# Altium PCB Single_ETU_b_rev1.PcbDoc (part 6 of 6)
Units mil, origin at the board's own origin, x right, y up, seen from the top; angles counter-clockwise.
Board outline 5341 x 2710 mil, 10 copper layers (Top Layer, GND1, Signal 1, GND2, VDDA, VDD, GND3, Signal 2, GND4, Bottom Layer), stack 59.76 mil thick; 283 components, 478 nets, 1863 pads, 875 vias.
Unrouted connection lines stored in the file: 3.
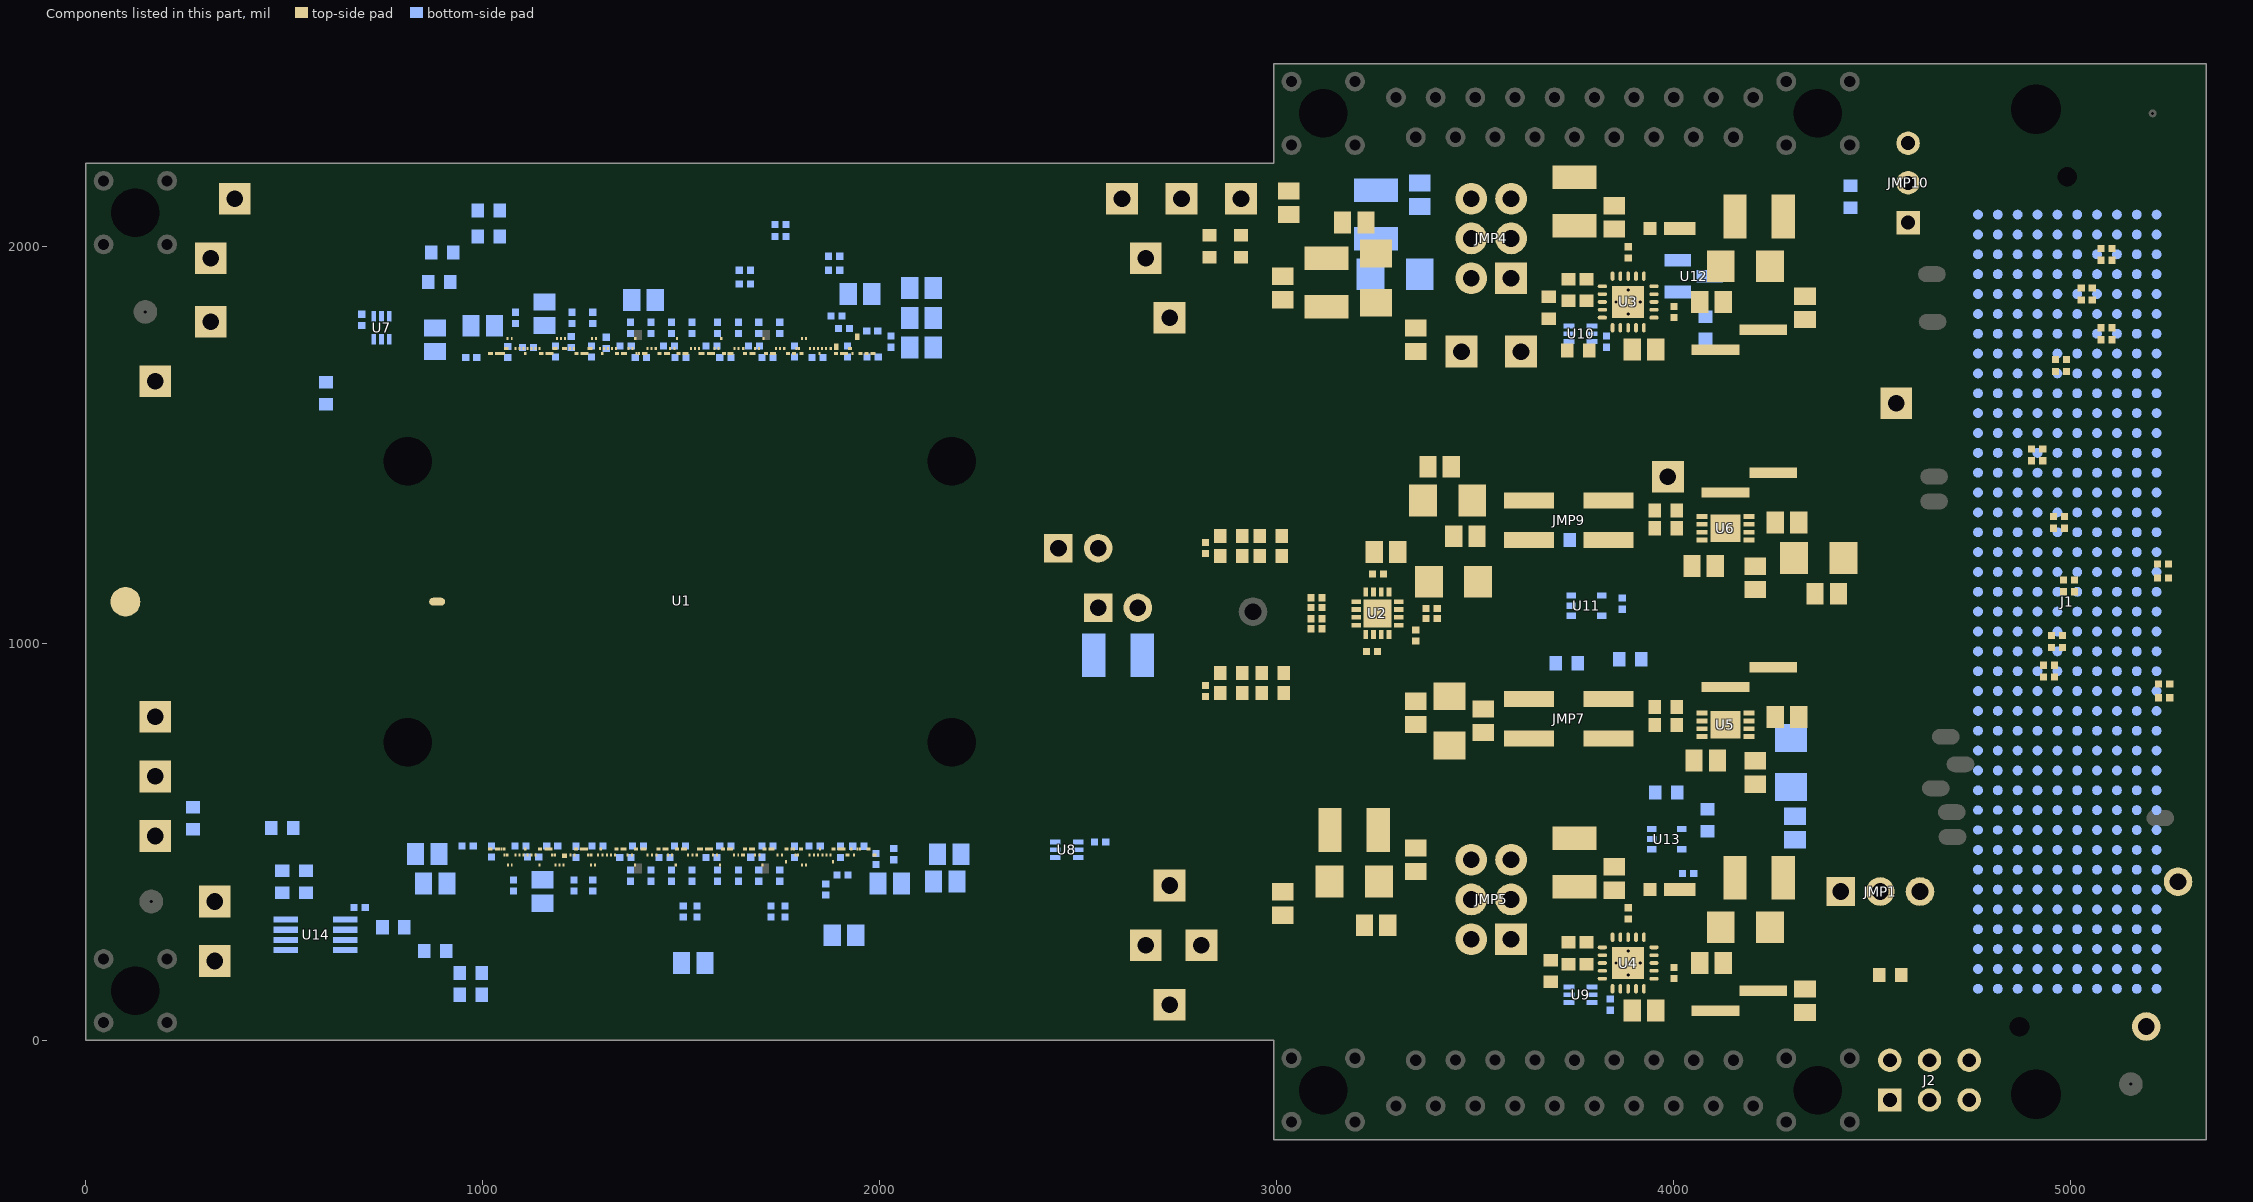
[diagram p14: the components of this part, seen from the top]

## Silkscreen, mask and mechanical layers (free items; w line width, h text height) (continued)
Mechanical 1:
  drawing of 613 lines, arcs and shapes, not listed
  text "62mm MCP" at 1260,2225 h55
  text "0.0" at 923,1691.24 h8
  text "0.0" at 2048,1691 h8
  text "high volt wire path" at -235,945 h50
  text "Timepix4 / Top" at 1486,626 h60
  text "0.0" at 923,512 h8
  text "keep out regions" at 2115,-180 h50
  text "Bottom side / J1  FMC HPC / Mezzanine (Male) / Samtec / ASP-134488-01 / 10mm mating height" at 5510,-865 h60
  text "UCB: Space Sciences Lab" at 2593,-1409 h60
  text "Single Timepix (ETU)" at 2636,-1790 h70
  text "M Dexter" at 1645,-1818 h45
  text "Apr 2021" at 2073,-1855 h45
  text "1" at 3900,-2183 h45
  text "EAG00233" at 3251,-2190 h45
  text "EAG" at 2700,-2193 h45
Mechanical 2:
  text "MECH 2 : BOND WIRES" at -20,-1745 h50
Mechanical 3:
  lines w10: 1982.22,1708 1982.22,2800 ; 4910,2425 4910,2475 4949,2514 5399,2514 5503.5,2618.5 ; 5016,2460 5046,2490 5046,2730 5016,2760 5016,2800 ; 0,0 2992,0 2992,-250 5341,-250 5341,2460 2992,2460 2992,2210 0,2210 0,0
  text ".050\" / dia" at 4816,2725 h60
  text "1 of 2 / 0.125\" dia / mounting hole / reserved micro / jack screw standoff" at 5484,2646 h60
  text "MECH 3 : DIMENSION LINES" at -470,-1870 h50
Mechanical 4:
  lines w3: 0,2210 2742,2210 2992,2210 2992,2460 5341,2460 5341,-250 2992,-250 2992,0 0,0 0,2210 ; 0,2210 0,2210
  text "MECH 4 : BOARD OUTLINE" at 55,-1995 h50
Mechanical 5:
  text "MECH 5 : BOARD CORNER FIDUCIALS" at 10,-2185 h50
Mechanical 6:
  text "MECH 6 : PLACEMENT PRACTICE" at -110,-2320 h50
Fab Notes:
  rectangle: 1757,425 1774,440
  rectangle: 1433,1739 1445,1755
  rectangle: 1491,1733 1498,1747
  region: 1873.5,471 1873.5,462 1895,462 1895,471
  region: 1906,482 1893.5,482 1893.5,462 1906,462
  rectangle: 1705,461 1714,477
  rectangle: 1705,454 1725,471
  region: 1495,464 1495,474 1485,474 1485,464
  rectangle: 1484.5,473 1494.5,479
  rectangle: 1483,420 1504,446
  rectangle: 1879,434 1892,454
  rectangle: 1761,434 1774,459
  rectangle: 1434,455 1443,471
  rectangle: 1536,455 1546,471
  rectangle: 1651,445 1665,471
  rectangle: 1031,476 1110.03,505
  rectangle: 1381,1764 1395,1785
  rectangle: 1756.5,1739 1769,1755
  rectangle: 1653,1739 1665,1755
  rectangle: 1617,1705 1632,1734
  rectangle: 1348.5,1705 1364,1734
  rectangle: 1704.5,476 1714.5,492
  region: 1977,505 1967,505 1967,478 1977,478
  region: 1956.5,493 1941.5,493 1941.5,476 1956.5,476
  rectangle: 1945,469 1960,493
  rectangle: 1911.5,451 1926,471
  rectangle: 1893.5,476 1931,505
  rectangle: 1867,476 1888.5,493
  rectangle: 1783,453 1805,471
  rectangle: 1670.5,476 1685.5,505
  region: 1363,476 1363,505 1346.5,505 1346.5,476
  rectangle: 1615.5,476 1630.5,505
  rectangle: 1559.5,476 1579.5,505
  rectangle: 1452.5,476 1467.5,505
  rectangle: 1499.5,477 1514.5,505
  rectangle: 1376.51,476 1391.51,492
  rectangle: 1701,420 1721,446
  rectangle: 1595,420 1620,446
  rectangle: 1381,420 1401,446
  rectangle: 1314.5,476 1341.5,492
  rectangle: 1245.5,476 1303,505
  rectangle: 1204,476 1240.03,492
  rectangle: 1124,476 1149.53,492
  rectangle: 1155.25,476 1189,505
  rectangle: 1945,1718 1956.01,1734
  rectangle: 1961.49,1705 1971.49,1734
  rectangle: 1919,1739 1941.5,1758
  rectangle: 1900.01,1705 1934,1734
  rectangle: 1873.5,1718 1894.5,1734
  rectangle: 1784,1739 1807,1758
  rectangle: 1746.5,1718 1773.5,1734
  rectangle: 1708,1718 1718,1747
  rectangle: 1704.03,1764 1717.03,1781
  rectangle: 1598,1764 1611,1781
  rectangle: 1671.5,1705 1686.5,1734
  rectangle: 1564.5,1705 1584.5,1734
  rectangle: 1601.75,1718 1612,1751
  rectangle: 1542.5,1739 1554.5,1755
  rectangle: 1484.5,1763.5 1499,1784
  rectangle: 1456,1705 1471,1734
  rectangle: 1486.1,1719 1497.5,1734
  rectangle: 1503,1705 1518,1734
  rectangle: 1400.5,1705 1415.5,1734
  rectangle: 1246.5,1705 1305,1734
  rectangle: 1212,1718 1241,1734
  rectangle: 1124,1718 1153,1734
  rectangle: 1158.5,1705 1198,1734
  rectangle: 1031,1705 1111,1734
  rectangle: 1041.23,1739 1065,1755.02
  rectangle: 1001.61,1718 1025.39,1735
  rectangle: 1162.23,1739 1188,1755
  rectangle: 1599,471 1610,492
  rectangle: 1748,476 1770.5,492
  rectangle: 1529,1718 1558,1734
  rectangle: 1423.5,1719 1450.5,1734
  rectangle: 1317.5,1718 1343.5,1734
  rectangle: 1252,1739 1276,1755
  rectangle: 1385,1718 1395.5,1743
  rectangle: 1778.5,1705 1851,1734
  rectangle: 1775.5,476 1852,505
  rectangle: 1421,476 1447.5,492
  rectangle: 1483.5,478 1494.5,492
  rectangle: 1525.5,476 1554.5,492
  rectangle: 1641.5,476 1665.5,492
  rectangle: 1009.78,502 1982.22,1708
  rectangle: 1723.5,1705 1738.5,1734
  rectangle: 1641,1718 1666,1734
  rectangle: 1719.5,476 1734.5,505
  rectangle: 1397.5,478 1412.5,505
  lines w8: 1490,1731.34 1493.95,1735.29 1493.95,1737.68 1505,1748.73
  text "SOFT GOLD" at 1150,-275 h50
Drill Drawing:
  drawing of 875 lines, arcs and shapes, not listed
  text "1" at -9521,11925 h70
  text "2" at -5526,11925 h70
  text "3" at -1531,11925 h70
  text "4" at 2470.01,11925 h70
  text "5" at 6468.34,11925 h70
  text "6" at 10466.68,11925 h70
  text "7" at 14468.34,11925 h70
  text "8" at 18463.34,11925 h70
  text "REVISION STATUS" at 16775.6,11640.54 h109.4
  text "DRAWN" at 18296,11463 h60
  text "APPROVED" at 19097,11462.44 h60
  text "DATE" at 19805.6,11462.44 h60
  text "REV" at 15610.8,11453.44 h60
  text "DESCRIPTION" at 16516,11443 h75
  text "Jason" at 19016,11198 h70
  text "Apr 2021" at 19696,11134 h60
  text "INITIAL RELEASE" at 16471,11133 h60
  text "0" at 15620,11121 h60
  text "McPhate" at 19016,11068 h70
  text "M Dexter" at 18205,11013 h70
  text "NOTES (UNLESS OTHERWISE SPECIFIED):" at -8563,10559 h125
  text "1. MATERIAL .063 INCH THICK POLYIMIDE, 10 LAYERS." at -8368,10175 h125
  text "1/2 OZ. COPPER CLAD, OUTER LAYERS AND INNER LAYERS 3 AND 8." at -8043,9950 h125
  text "Layer" at 10167.5,9800.47 h60
  text "Name" at 10577.41,9800.47 h60
  text "Material" at 11507.16,9800.47 h60
  text "Thickness" at 12366.92,9800.47 h60
  text "Constant" at 13016.76,9800.47 h60
  text "Board Layer Stack" at 13586.62,9800.47 h60
  text "1 OZ. COPPER CLAD, INNER PLANE AND SPLIT PLANE LAYERS." at -8053,9705 h125
  text "Top Overlay" at 10577.41,9680.47 h60
  text "Top Solder" at 10577.41,9560.47 h60
  text "Solder Resist" at 11507.16,9560.47 h60
  text "0.50mil" at 12366.92,9560.47 h60
  text "4.2" at 13016.76,9560.47 h60
  text "A" at -11378,9527 h70
  text "A" at 20322,9527 h70
  text "OUTER LAYERS 1 AND 10 CONTROLLED  IMPEDANCE TO BE 93 OHM" at -8038,9470 h125
  text "1" at 10167.5,9440.47 h60
  text "Top Layer" at 10577.41,9440.47 h60
  text "0.69mil" at 12366.92,9440.47 h60
  text "Dielectric 1" at 10577.41,9320.47 h60
  text "FR-4" at 11507.16,9320.47 h60
  text "4.42mil" at 12366.92,9320.47 h60
  text "3.41" at 13016.76,9320.47 h60
  text "DIFFERENTIAL FOR .00504 WIDE MIICROSTRIP TRACES REFERENCE PLANES LAYERS 2 AND 9" at -8038,9238 h125
  text "2" at 10167.5,9200.47 h60
  text "GND1" at 10577.41,9200.47 h60
  text "CF-004" at 11507.16,9200.47 h60
  text "1.38mil" at 12366.92,9200.47 h60
  text "Dielectric 2" at 10577.41,9080.47 h60
  text "7.00mil" at 12366.92,9080.47 h60
  text "3.89" at 13016.76,9080.47 h60
  text "INNER LAYERS 3 AND 8 CONTROLLED  IMPEDANCE TO BE 93 OHM" at -8043,8975 h125
  text "3" at 10167.5,8960.47 h60
  text "Signal 1" at 10577.41,8960.47 h60
  text "CF-004" at 11507.16,8960.47 h60
  text "0.69mil" at 12366.92,8960.47 h60
  text "Dielectric 3" at 10577.41,8840.47 h60
  text "PP-006" at 11507.16,8840.47 h60
  text "5.15mil" at 12366.92,8840.47 h60
  text "3.505" at 13016.76,8840.47 h60
  text "DIFFERENTIAL FOR .00516 WIDE STRIPLINE TRACES (SYMMTERIC REFERENCE PLANES LAYERS 2/4 AND 7/9" at -8043,8743 h125
  text "4" at 10167.5,8720.47 h60
  text "GND2" at 10577.41,8720.47 h60
  text "CF-004" at 11507.16,8720.47 h60
  text "1.38mil" at 12366.92,8720.47 h60
  text "Dielectric 4" at 10577.41,8600.47 h60
  text "PP-006" at 11507.16,8600.47 h60
  text "4.20mil" at 12366.92,8600.47 h60
  text "3.52" at 13016.76,8600.47 h60
  text "5" at 10167.5,8480.47 h60
  text "VDDA" at 10577.41,8480.47 h60
  text "CF-004" at 11507.16,8480.47 h60
  text "1.38mil" at 12366.92,8480.47 h60
  text "0.063\"" at 15500.2,8387.5 h75
  text "2. PLATE INDICATED AREAS, SEE GOLD MASK, WITH 7-15 MICROINCHES OF SOFT BONDABLE GOLD," at -8398,8375.02 h125
  text "Dielectric 5" at 10577.41,8360.47 h60
  text "PP-006" at 11507.16,8360.47 h60
  text "7.20mil" at 12366.92,8360.47 h60
  text "3.6" at 13016.76,8360.47 h60
  text "+/- 10%" at 15483.2,8251.5 h62.5
  text "6" at 10167.5,8240.47 h60
  text "VDD" at 10577.41,8240.47 h60
  text "CF-004" at 11507.16,8240.47 h60
  text "1.38mil" at 12366.92,8240.47 h60
  text "OVER 100-150 MICROINCHES OF NICKEL, TOP SIDE ONLY." at -8068,8131.38 h125
  text "Dielectric 7" at 10577.41,8120.47 h60
  text "PP-006" at 11507.16,8120.47 h60
  text "4.20mil" at 12366.92,8120.47 h60
  text "3.52" at 13016.76,8120.47 h60
  text "7" at 10167.5,8000.47 h60
  text "GND3" at 10577.41,8000.47 h60
  text "CF-004" at 11507.16,8000.47 h60
  text "1.38mil" at 12366.92,8000.47 h60
  text "3. ELECTROLESS NICKEL IMMERSION GOLD (ENIG) IPC-4522 BOTH SIDES." at -8402,7995 h125
  text "Dielectric 6" at 10577.41,7880.47 h60
  text "PP-006" at 11507.16,7880.47 h60
  text "5.15mil" at 12366.92,7880.47 h60
  text "3.505" at 13016.76,7880.47 h60
  text "4. ALL PLATED THROUGH HOLES TO HAVE PLATING IN HOLES .001 MINIMUM THICKNESS." at -8395,7778 h125
  text "8" at 10167.5,7760.47 h60
  text "Signal 2" at 10577.41,7760.47 h60
  text "CF-004" at 11507.16,7760.47 h60
  text "0.69mil" at 12366.92,7760.47 h60
  text "Dielectric 8" at 10577.41,7640.47 h60
  text "PP-006" at 11507.16,7640.47 h60
  text "7.00mil" at 12366.92,7640.47 h60
  text "3.89" at 13016.76,7640.47 h60
  text "5. HOLES SIZES ARE AFTER PLATING." at -8391,7540 h125
  text "9" at 10167.5,7520.47 h60
  text "GND4" at 10577.41,7520.47 h60
  text "CF-004" at 11507.16,7520.47 h60
  text "1.38mil" at 12366.92,7520.47 h60
  text "Dielectric 9" at 10577.41,7400.47 h60
  text "PP-006" at 11507.16,7400.47 h60
  text "4.42mil" at 12366.92,7400.47 h60
  text "3.41" at 13016.76,7400.47 h60
  text "6. FULLY PLUG ALL 16MIL VIAS WITH CONDUCTIVE MATERIAL" at -8391,7316 h125
  text "10" at 10167.5,7280.47 h60
  text "Bottom Layer" at 10577.41,7280.47 h60
  text "0.69mil" at 12366.92,7280.47 h60
  text "Bottom Solder" at 10577.41,7160.47 h60
  text "Solder Resist" at 11507.16,7160.47 h60
  text "0.50mil" at 12366.92,7160.47 h60
  text "4.2" at 13016.76,7160.47 h60
  text "7. THE FOUR 0.122\" HOLES AT (X=811,Y=751), (X=811,Y=1459), (X=2181,Y=751), and (X=2181,Y=1459) ARE COUNTERSINK 100 DEG X 0.200\" WIDE." at -8410,7097 h125
  text "Bottom Overlay" at 10577.41,7040.47 h60
  text "8. SOLDER MASK COMP AND SOLDER SIDE OVER" at -8406,6878 h125
  text "BARE COPPER WITH LIQUID PHOTO-IMAGEABLE" at -8064,6654 h125
  text "SOLDER MASK, COLOR: GREEN." at -8067,6442 h125
  text "9. SILKSCREEN COMP AND SOLDER SIDES USING" at -8414,6222 h125
  text "NON-CONDUCTIVE EPOXY INK, COLOR: WHITE." at -8061,5989 h125
  text "10.DIELECTRIC THICKNESS CONTROL FOR OUTER AND INNER LAYERS" at -8414,5756 h125
  text "TO ACHIEVE 93 OHM DIFFERENTIAL IMPEDANCE" at -8108,5544 h125
  text "11.BOARD FABRICATION SHALL BE PER IPC 6012B CLASS 2." at -8403,5309 h125
  text "B" at -11378,4527 h70
  text "B" at 20322,4527 h70
  text "BOARD HAS 93 OHM IMPEDANCE DIFFERENTIAL SYMMETRIC STRIPLINE TRACES LAYERS 3 AND 8" at 10092,3998 h100
  text "REFERENCE PLANES LAYERS 2 / 4, AND 7 / 9 RESPECTIVELY" at 10086,3698 h100
  text "BOARD HAS 93 OHM IMPEDANCE DIFFERENTIAL MICROSTRIP TRACES LAYERS 1 AND 10" at 10105.31,3281.17 h100
  text "REFERENCE PLANES LAYERS 2 AND 9 RESPECTIVELY" at 10096,3003 h100
  text "C" at -11378,-473 h70
  text "C" at 20322,-473 h70
  text "Symbol" at -9605.06,-4575.01 h72
  text "Count" at -9099.18,-4575.01 h72
  text "Hole Size" at -8459.35,-4575.01 h72
  text "Plated" at -7309.69,-4575.01 h72
  text "Hole Type" at -6803.82,-4575.01 h72
  text "Drill Layer Pair" at -6070.01,-4575.01 h72
  text "Via/Pad" at -4570.46,-4575.01 h72
  text "Pad Shape" at -3980.61,-4575.01 h72
  text "Template" at -3234.82,-4575.01 h72
  text "Description" at -2095.15,-4575.01 h72
  text "Hole Tolerance (+)" at -1241.39,-4575.01 h72
  text "Hole Tolerance (-)" at 92.22,-4575.01 h72
  text "2" at -9099.18,-4725.01 h60
  text "50.00mil (1.270mm)" at -8459.35,-4725.01 h60
  text "NPTH" at -7309.69,-4725.01 h60
  text "Round" at -6803.82,-4725.01 h60
  text "Top Layer - Bottom Layer" at -6070.01,-4725.01 h60
  text "Pad" at -4570.46,-4725.01 h60
  text "Rounded" at -3980.61,-4725.01 h60
  text "c5hn127" at -3234.82,-4725.01 h60
  text "2" at -9099.18,-4875.01 h60
  text "125.00mil (3.175mm)" at -8459.35,-4875.01 h60
  text "NPTH" at -7309.69,-4875.01 h60
  text "Round" at -6803.82,-4875.01 h60
  text "Top Layer - Bottom Layer" at -6070.01,-4875.01 h60
  text "Pad" at -4570.46,-4875.01 h60
  text "Rounded" at -3980.61,-4875.01 h60
  text "c5hn318" at -3234.82,-4875.01 h60
  text "3" at -9099.18,-5025.01 h60
  text "35.43mil (0.900mm)" at -8459.35,-5025.01 h60
  text "PTH" at -7309.69,-5025.01 h60
  text "Round" at -6803.82,-5025.01 h60
  text "Top Layer - Bottom Layer" at -6070.01,-5025.01 h60
  text "Pad" at -4570.46,-5025.01 h60
  text "(Mixed)" at -3980.61,-5025.01 h60
  text "(Mixed)" at -3234.82,-5025.01 h60
  text "6" at -9099.18,-5175.01 h60
  text "35.00mil (0.889mm)" at -8459.35,-5175.01 h60
  text "PTH" at -7309.69,-5175.01 h60
  text "Round" at -6803.82,-5175.01 h60
  text "Top Layer - Bottom Layer" at -6070.01,-5175.01 h60
  text "Pad" at -4570.46,-5175.01 h60
  text "Rounded" at -3980.61,-5175.01 h60
  text "(Mixed)" at -3234.82,-5175.01 h60
  text "10" at -9099.18,-5325.01 h60
  text "122.00mil (3.099mm)" at -8459.35,-5325.01 h60
  text "NPTH" at -7309.69,-5325.01 h60
  text "Round" at -6803.82,-5325.01 h60
  text "Top Layer - Bottom Layer" at -6070.01,-5325.01 h60
  text "Pad" at -4570.46,-5325.01 h60
  text "Rounded" at -3980.61,-5325.01 h60
  text "(Mixed)" at -3234.82,-5325.01 h60
  text "D" at -11378,-5473 h70
  text "D" at 20322,-5473 h70
  text "46" at -9099.18,-5475.01 h60
  text "42.00mil (1.067mm)" at -8459.35,-5475.01 h60
  text "PTH" at -7309.69,-5475.01 h60
  text "Round" at -6803.82,-5475.01 h60
  text "Top Layer - Bottom Layer" at -6070.01,-5475.01 h60
  text "(Mixed)" at -4570.46,-5475.01 h60
  text "(Mixed)" at -3980.61,-5475.01 h60
  text "(Mixed)" at -3234.82,-5475.01 h60
  text "62" at -9099.18,-5625.01 h60
  text "28.00mil (0.711mm)" at -8459.35,-5625.01 h60
  text "PTH" at -7309.69,-5625.01 h60
  text "Round" at -6803.82,-5625.01 h60
  text "Top Layer - Bottom Layer" at -6070.01,-5625.01 h60
  text "Pad" at -4570.46,-5625.01 h60
  text "Rounded" at -3980.61,-5625.01 h60
  text "c127h71_2855881866" at -3234.82,-5625.01 h60
  text "160" at -9099.18,-5775.01 h60
  text "16.00mil (0.406mm)" at -8459.35,-5775.01 h60
  text "PTH" at -7309.69,-5775.01 h60
  text "Round" at -6803.82,-5775.01 h60
  text "Top Layer - Bottom Layer" at -6070.01,-5775.01 h60
  text "Via" at -4570.46,-5775.01 h60
  text "Rounded" at -3980.61,-5775.01 h60
  text "v76h41" at -3234.82,-5775.01 h60
  text "725" at -9099.18,-5925.01 h60
  text "8.00mil (0.203mm)" at -8459.35,-5925.01 h60
  text "PTH" at -7309.69,-5925.01 h60
  text "Round" at -6803.82,-5925.01 h60
  text "Top Layer - Bottom Layer" at -6070.01,-5925.01 h60
  text "(Mixed)" at -4570.46,-5925.01 h60
  text "Rounded" at -3980.61,-5925.01 h60
  text "(Mixed)" at -3234.82,-5925.01 h60
  text "1016 Total" at -9099.18,-6075.01 h60
  text "UNLESS OTHERWISE SPECIFIED:" at 14363.07,-6478.93 h31
  text "ENGINEER:" at 15747,-6485 h45
  text "TITLE:" at 17247,-6485 h45
  text "ALL DIMENSIONS ARE IN INCHES" at 14363.07,-6561.63 h27.9
  text "Jason McPhate, Matt Dexter" at 15740,-6600 h70
  text "REMOVE ALL BURRS" at 14363.07,-6644.23 h27.9
  text "UCB: Space Sciences Lab" at 17460,-6690 h135
  text "BREAK ALL SHARP EDGES" at 14363.07,-6726.93 h27.9
  text "PCB DESIGNER:" at 15747,-6780 h45
  text "TOLERANCES ARE FOR FINISHED PART" at 14363.07,-6809.63 h27.9
  text "TOLERANCES FOR FINISHED PART:" at 14363.07,-6892.33 h27.9
  text "X= +/- 0.1" at 14363.07,-6974.93 h27.9
  text "ANGULAR= +/- 0.003" at 14900.37,-6974.93 h27.9
  text "XX= +/- 0.01" at 14363.07,-7057.63 h27.9
  text "HOLE DIA=" at 14900.37,-7057.63 h27.9
  text "DATE:" at 15747,-7085 h45
  text "PART NO.:" at 17247,-7085 h45
  text "REV:" at 19347,-7085 h45
  text "XXX= +/- 0.001" at 14363.07,-7140.33 h27.9
  text "1" at 19659,-7192 h80
  text "Single Timepix4  (ETU)" at 17562,-7200 h90
  text "Apr 19, 2021" at 15797,-7205 h70
  text "MATERIAL" at 14350.93,-7240 h31
  text "FILE NAME:" at 15747,-7385 h45
  text "DWG NO:" at 17247,-7385 h45
  text "SCALE:" at 19347,-7385 h45
  text "FINISH" at 14350.93,-7445 h31
  text "EAG 00233" at 17562,-7498 h90
  text "NONE" at 19636,-7507 h70
  text "1" at -9521,-7770 h70
  text "2" at -5526,-7770 h70
  text "3" at -1531,-7770 h70
  text "4" at 2470.01,-7770 h70
  text "5" at 6468.34,-7770 h70
  text "6" at 10466.68,-7770 h70
  text "7" at 14468.34,-7770 h70
  text "8" at 18463.34,-7770 h70
Assembly Top:
  lines w10: 49.7,-1933.7 1450.7,-1933.7 ; 49.7,-1733.7 1450.7,-1733.7 ; 49.7,-1533.7 1450.7,-1533.7 ; 49.7,-1333.7 1450.7,-1333.7 ; 49.7,-1133.7 1450.7,-1133.7 ; 925.7,-1933.7 925.7,-933.7 ; 1450.7,-2113.7 1450.7,-933.7 ; 1450.7,-1932.7 3649.7,-1932.7 ; 1450.7,-1732.7 3649.7,-1732.7 ; 1450.7,-1532.7 3649.7,-1532.7 ; 1450.7,-1232.7 3649.7,-1232.7 ; 2124.7,-2113.7 2124.7,-1932.7 ; 3174.7,-1732.7 3174.7,-1538.7 ; 49.7,-2113.7 3649.7,-2113.7 3649.7,-933.7 1449.7,-933.7 49.7,-933.7 49.7,-2113.7
  text "1. WORKMANSHIP IS IPC 610, CLASS 2." at 724.7,-357.7 h50
  text "2. POPULATE ASSEMBLY PER BILL OF MATERIALS" at 724.7,-457.7 h50
  text "3. STATIC SENSITIVE DEVICES. OBSERVE PROPER" at 724.7,-557.7 h50
  text "ESD HANDLING PROCEDURES." at 874.7,-657.7 h50
  text "APPROVALS" at 299.7,-1063.7 h60
  text "DATE" at 1099.7,-1063.7 h60
  text "TOP ASSEMBLY DRAWING" at 1727.7,-1117.7 h80
  text "DRAWN" at 99.7,-1213.7 h50
  text "Apr 2021" at 964.7,-1279.64 h60
  text "UCB: Space Sciences Lab" at 1723,-1356 h90
  text "Dexter" at 83,-1384 h60
  text "CHECKED" at 99.7,-1413.7 h50
  text "Apr 2021" at 961.7,-1480.64 h60
  text "TBD" at 294,-1499 h60
  text "ENGR" at 99.7,-1613.7 h50
  text "TIMEPIX4 SCB" at 2066,-1666 h80
  text "Apr 2021" at 971.83,-1671.41 h60
  text "TITLE:" at 1491.6,-1672.5 h80
  text "REV 1" at 3212.6,-1672.5 h80
  text "Dexter" at 264,-1697 h60
  text "QUALITY" at 99.7,-1813.7 h50
  text "EAG 00233" at 2036.92,-1869.13 h80
  text "ASSURANCE" at 99.7,-1913.7 h50
  text "PRINT DATE:" at 2199.7,-2063.7 h50
  text "Apr 2021" at 2724.7,-2063.7 h60
Assembly Bot:
  lines w10: 64.3,-1949.5 2263.3,-1949.5 ; 64.3,-1749.5 2263.3,-1749.5 ; 64.3,-1549.5 2263.3,-1549.5 ; 64.3,-1249.5 2263.3,-1249.5 ; 539.3,-1749.5 539.3,-1555.5 ; 1589.3,-2130.5 1589.3,-1949.5 ; 2263.3,-2130.5 2263.3,-950.5 ; 2263.3,-1950.5 3664.3,-1950.5 ; 2263.3,-1750.5 3664.3,-1750.5 ; 2263.3,-1550.5 3664.3,-1550.5 ; 2263.3,-1350.5 3664.3,-1350.5 ; 2263.3,-1150.5 3664.3,-1150.5 ; 2788.3,-1950.5 2788.3,-950.5 ; 64.3,-2130.5 3664.3,-2130.5 3664.3,-950.5 2264.3,-950.5 64.3,-950.5 64.3,-2130.5
  text "1. WORKMANSHIP IS IPC 610, CLASS 2." at 2989.3,-374.5 h50
  text "2. POPULATE ASSEMBLY PER BILL OF MATERIALS" at 2989.3,-474.5 h50
  text "3. STATIC SENSITIVE DEVICES. OBSERVE PROPER" at 2989.3,-574.5 h50
  text "ESD HANDLING PROCEDURES." at 2839.3,-674.5 h50
  text "DATE" at 2614.3,-1080.5 h60
  text "APPROVALS" at 3414.3,-1080.5 h60
  text "BOT ASSEMBLY DRAWING" at 1986.3,-1134.5 h80
  text "DRAWN" at 3614.3,-1230.5 h50
  text "Apr 2021" at 2749.3,-1296.44 h60
  text "Dexter" at 3774,-1355 h60
  text "UCB: Space Sciences Lab" at 1907,-1366 h90
  text "CHECKED" at 3614.3,-1430.5 h50
  text "Apr 2021" at 2752.3,-1497.44 h60
  text "TBD" at 3429,-1522 h60
  text "ENGR" at 3614.3,-1630.5 h50
  text "TIMEPIX4 SCB" at 1762,-1685 h80
  text "REV 1" at 501.4,-1689.3 h80
  text "TITLE:" at 2222.4,-1689.3 h80
  text "Apr 2021" at 2752.3,-1692.44 h60
  text "Dexter" at 3440,-1712 h60
  text "QUALITY" at 3614.3,-1830.5 h50
  text "EAG 00233" at 1782.53,-1892.15 h80
  text "ASSURANCE" at 3614.3,-1930.5 h50
  text "Apr 2021" at 989.3,-2080.5 h60
  text "PRINT DATE:" at 1514.3,-2080.5 h50

## Dimensions
1982.22,2800 to 4701.97,2985 on Mechanical 3
5341,2460 to 5206,2335 on Mechanical 5
5206,2335 to 5341,2460 on Mechanical 5
150,1835 to -5,2210 on Mechanical 5
5151,-110 to 5341,-250 on Mechanical 5
5151,-110 to 5341,-250 on Mechanical 5
0,0 to 165,350 on Mechanical 5
0,0 to 165,350 on Mechanical 5
5341,-250 to 4744,-150 on Mechanical 3
0,0 to 4544,-150 on Mechanical 3
4990.99,1105 to 4912.26,-135.15 on Mechanical 3
4990.99,1105 to 4912.26,2345.15 on Mechanical 3
4990.99,1105 to 4912.26,-135.15 on Mechanical 3
0,0 to 5341,-250 on Mechanical 3
0,0 to 265,1135 on Mechanical 3
0,0 to 1982.22,502 on Mechanical 3
0.5,1150 to 0.5,1350 on Mechanical 3
0,2210 to 125,2085 on Mechanical 3
1982.22,1708 to 1982.22,502 on Mechanical 3
0,0 to 945,1694.76 on Mechanical 3
4363,-125 to 4363,2335 on Mechanical 3
2992,0 to 3117,-125 on Mechanical 3
2992,-250 to 2992,0 on Mechanical 3
5341,2460 to 5341,-250 on Mechanical 3
2992,2210 to 3117,2335 on Mechanical 3
2992,2210 to 2992,2460 on Mechanical 3
0,0 to 2763,182 on Mechanical 3
3117,2335 to 4363,2335 on Mechanical 3
5341,-250 to 5347,1105 on Mechanical 3
1496,1105 to 0,0 on Mechanical 3
1496,1105 to 0,0 on Mechanical 3
1009.78,502 to 0,0 on Mechanical 3
1009.78,502 to 0,0 on Mechanical 3
0,0 to 811,751 on Mechanical 3
0,0 to 125,125 on Mechanical 3
0,0 to 811,751 on Mechanical 3
4701.97,2479.83 to 5279.97,2486.28 on Mechanical 3
4871,34.5 to 4991,2175.5 on Mechanical 3
4871,34.5 to 4990.99,1105 on Mechanical 3
4871,34.5 to 4991,7 on Mechanical 3
4991,2175.5 to 0,0 on Mechanical 3
811,1459 to 0,0 on Mechanical 3
811,1459 to 2181,1459 on Mechanical 3
2181,751 to 2181,1459 on Mechanical 3
1009.56,2310 to 1982,2310 on Mechanical 3
0,0 to 2992,0 on Mechanical 3
0,0 to 0,2210 on Mechanical 3
0,0 to 125,2085 on Mechanical 3
0,0 to 125,125 on Mechanical 3
0,0 to 2181,751 on Mechanical 3
0,0 to 4363,-125 on Mechanical 3
0,0 to 3117,-125 on Mechanical 3

## Text inside footprints (layer, text, board x,y; h text height)
J2: Top Overlay "1" at 4464,-170 h50; Top Overlay "2" at 4444,-70 h50; Top Overlay "5" at 4804,-170 h50; Top Overlay "6" at 4804,-70 h50
U1: Mechanical 1 "39" at 2047,1729 h8; Mechanical 1 "30" at 2047,1716.5 h8; Mechanical 1 "44" at 2047,1739 h8; Mechanical 1 "69" at 2048,1761 h8; Mechanical 1 "VDDGWT" at 1757.22,1660.8 h4.72 r90; Mechanical 1 "GNDGWT" at 1738.22,1660.8 h4.72 r90; Mechanical 1 "TEST_OUT_P" at 1829.39,1642.65 h4.72 r90; Mechanical 1 "DIG_PIX_1" at 1822.24,1649.85 h4.72 r90; Mechanical 1 "DIG_PIX_0" at 1815.72,1648.79 h4.72 r90; Mechanical 1 "TEST_OUT_N" at 1835.72,1642.79 h4.72 r90; Mechanical 1 "SERIAL_OUT_7_N" at 1750.6,1623.82 h4.72 r90; Mechanical 1 "GNDGWT" at 1686.22,1660.8 h4.72 r90; Mechanical 1 "VDDGWT" at 1705.22,1660.8 h4.72 r90; Mechanical 1 "SERIAL_OUT_6_P" at 1692.6,1623.82 h4.72 r90; Mechanical 1 "SERIAL_OUT_6_N" at 1698.6,1623.82 h4.72 r90; Mechanical 1 "GNDGWT" at 1516.8,1660.73 h4.72 r90; Mechanical 1 "SERIAL_OUT_3_P" at 1524,1623.83 h4.72 r90; Mechanical 1 "SERIAL_OUT_3_N" at 1530,1623.83 h4.72 r90; Mechanical 1 "GNDGWT" at 1464.26,1660.76 h4.72 r90; Mechanical 1 "VDDGWT" at 1484.17,1661.08 h4.72 r90; Mechanical 1 "SERIAL_OUT_2_P" at 1471.17,1623.58 h4.72 r90; Mechanical 1 "SERIAL_OUT_7_P" at 1744.6,1623.82 h4.72 r90; Mechanical 1 "GND2V5" at 1932.21,1644.79 h4.72 r90; Mechanical 1 "GND" at 1406.31,1675.69 h4.72 r90; Mechanical 1 "GND" at 1400.04,1675.73 h4.72 r90; Mechanical 1 "VDD" at 1387.04,1675.73 h4.72 r90; Mechanical 1 "VDD" at 1393.31,1675.69 h4.72 r90; Mechanical 1 "GNDA" at 1965.21,1654.79 h4.72 r90; Mechanical 1 "VDD2V5" at 1939.21,1644.79 h4.72 r90; Mechanical 1 "TO_SYNC_P" at 1308.71,1646.81 h4.72 r90; Mechanical 1 "TO_SYNC_N" at 1315.52,1646.73 h4.72 r90; Mechanical 1 "RESET_P" at 1322.75,1656.75 h4.72 r90; Mechanical 1 "RESET_N" at 1329,1656.58 h4.72 r90; Mechanical 1 "GNDGWT" at 1412.56,1661.7 h4.72 r90; Mechanical 1 "SERIAL_OUT_2_N" at 1477.43,1623.79 h4.72 r90; Mechanical 1 "VDDGWT" at 1432.26,1661.76 h4.72 r90; Mechanical 1 "SERIAL_OUT_1_P" at 1419.68,1624.77 h4.72 r90; Mechanical 1 "SERIAL_OUT_1_N" at 1425.68,1624.77 h4.72 r90; Mechanical 1 "GNDGWT" at 1634.22,1660.8 h4.72 r90; Mechanical 1 "VDDGWT" at 1653.22,1660.8 h4.72 r90; Mechanical 1 "SERIAL_OUT_5_P" at 1640.6,1623.82 h4.72 r90; Mechanical 1 "SERIAL_OUT_5_N" at 1646.6,1623.82 h4.72 r90; Mechanical 1 "VDDGWT" at 1601.22,1660.8 h4.72 r90; Mechanical 1 "SERIAL_OUT_4_P" at 1588.55,1623.82 h4.72 r90; Mechanical 1 "SERIAL_OUT_4_N" at 1594.55,1623.82 h4.72 r90; Mechanical 1 "SERIAL_OUT_0_N" at 1373.71,1624.77 h4.72 r90; Mechanical 1 "GND" at 1730.14,1659.01 h4.72 r90; Mechanical 1 "VDD" at 1607.98,1674.8 h4.72 r90; Mechanical 1 "VDD" at 1614.25,1674.76 h4.72 r90; Mechanical 1 "GND" at 1620.72,1659.05 h4.72 r90; Mechanical 1 "GND" at 1626.99,1659.01 h4.72 r90; Mechanical 1 "VDD" at 1490.99,1675.79 h4.72 r90; Mechanical 1 "VDD" at 1497.25,1675.76 h4.72 r90; Mechanical 1 "GND" at 1503.98,1675.8 h4.72 r90; Mechanical 1 "GND" at 1510.25,1675.76 h4.72 r90; Mechanical 1 "VDD" at 1068.21,1675.79 h4.72 r90; Mechanical 1 "VDD" at 1062.21,1675.79 h4.72 r90; Mechanical 1 "GND" at 1055.21,1675.79 h4.72 r90; Mechanical 1 "GND" at 1049.21,1675.79 h4.72 r90; Mechanical 1 "GNDA" at 1042.24,1670.76 h4.72 r90; Mechanical 1 "GNDA" at 1035.74,1670.76 h4.72 r90; Mechanical 1 "VDDA" at 1029.24,1670.76 h4.72 r90; Mechanical 1 "VDDA" at 1022.74,1670.76 h4.72 r90; Mechanical 1 "SC_CLOCK_IN_P" at 1074.48,1629.73 h4.72 r90; Mechanical 1 "SC_CLOCK_IN_N" at 1080.48,1629.73 h4.72 r90; Mechanical 1 "SC_DATA_IN_P" at 1087.45,1634.76 h4.72 r90; Mechanical 1 "SC_DATA_IN_N" at 1094.45,1634.76 h4.72 r90; Mechanical 1 "VDDGWT" at 1380.5,1661.77 h4.72 r90; Mechanical 1 "SERIAL_OUT_0_P" at 1367.71,1624.77 h4.72 r90; Mechanical 1 "GNDGWT" at 1361.5,1661.77 h4.72 r90; Mechanical 1 "CLK_REF_PLL_P" at 1853.71,1627.81 h4.72 r90; Mechanical 1 "CLK_REF_PLL_N" at 1859.71,1627.81 h4.72 r90; Mechanical 1 "DAC_OUT" at 1971.44,1657.81 h4.72 r90; Mechanical 1 "VDD" at 1926.22,1675.8 h4.72 r90; Mechanical 1 "VDD" at 1919.22,1675.8 h4.72 r90; Mechanical 1 "GND" at 1906.22,1675.8 h4.72 r90; Mechanical 1 "GND" at 1913.22,1675.8 h4.72 r90; Mechanical 1 "VDDPST" at 1842.16,1661.77 h4.72 r90; Mechanical 1 "GNDPST" at 1848.25,1661.76 h4.72 r90; Mechanical 1 "GNDPLL" at 1867.22,1660.8 h4.72 r90; Mechanical 1 "VDDPLL" at 1874.21,1645.79 h4.72 r90; Mechanical 1 "VDD" at 1789.98,1675.8 h4.72 r90; Mechanical 1 "VDD" at 1796.25,1675.76 h4.72 r90; Mechanical 1 "GND" at 1802.38,1659.8 h4.72 r90; Mechanical 1 "GND" at 1809.21,1659.79 h4.72 r90; Mechanical 1 "VDD" at 1711.98,1674.8 h4.72 r90; Mechanical 1 "VDD" at 1718.25,1674.76 h4.72 r90; Mechanical 1 "GND" at 1723.87,1659.05 h4.72 r90; Mechanical 1 "VDDA" at 1237.28,1670.72 h4.72 r90; Mechanical 1 "GNDA" at 1244.02,1670.76 h4.72 r90; Mechanical 1 "GNDA" at 1250.28,1670.72 h4.72 r90; Mechanical 1 "GND" at 1257.04,1675.73 h4.72 r90; Mechanical 1 "GND" at 1263.31,1675.69 h4.72 r90; Mechanical 1 "VDD" at 1270.04,1675.73 h4.72 r90; Mechanical 1 "VDD" at 1276.31,1675.69 h4.72 r90; Mechanical 1 "SHUTTER_P" at 1282.26,1647.71 h4.72 r90; Mechanical 1 "SHUTTER_N" at 1288.52,1647.67 h4.72 r90; Mechanical 1 "VDDPST" at 1295.68,1661.54 h4.72 r90; Mechanical 1 "GNDPST" at 1301.95,1661.5 h4.72 r90; Mechanical 1 "VDDA" at 1335.02,1670.76 h4.72 r90; Mechanical 1 "VDDA" at 1341.28,1670.72 h4.72 r90; Mechanical 1 "GNDA" at 1348.02,1670.76 h4.72 r90; Mechanical 1 "GNDA" at 1354.28,1670.72 h4.72 r90; Mechanical 1 "VDDA" at 1439.02,1669.76 h4.72 r90; Mechanical 1 "VDDA" at 1445.28,1669.72 h4.72 r90; Mechanical 1 "GNDA" at 1452.02,1669.76 h4.72 r90; Mechanical 1 "GNDA" at 1458.28,1669.72 h4.72 r90; Mechanical 1 "VDDA" at 1542.98,1669.8 h4.72 r90; Mechanical 1 "VDDA" at 1549.25,1669.76 h4.72 r90; Mechanical 1 "VDDPST" at 1101.24,1662.76 h4.72 r90; Mechanical 1 "GNDPST" at 1107.24,1662.76 h4.72 r90; Mechanical 1 "SDA_I2C" at 1113.48,1657.73 h4.72 r90; Mechanical 1 "SCL_I2C" at 1120.48,1657.73 h4.72 r90; Mechanical 1 "ADD_I2C_0" at 1126.48,1648.73 h4.72 r90; Mechanical 1 "ADD_I2C_1" at 1133.45,1649.76 h4.72 r90; Mechanical 1 "VDDA" at 1140.02,1670.76 h4.72 r90; Mechanical 1 "VDDA" at 1146.28,1670.72 h4.72 r90; Mechanical 1 "GNDA" at 1153.02,1670.76 h4.72 r90; Mechanical 1 "GNDA" at 1159.28,1670.72 h4.72 r90; Mechanical 1 "GND" at 1166.04,1675.73 h4.72 r90; Mechanical 1 "GND" at 1172.31,1675.69 h4.72 r90; Mechanical 1 "VDD" at 1179.04,1675.73 h4.72 r90; Mechanical 1 "VDD" at 1185.31,1675.69 h4.72 r90; Mechanical 1 "SC_DATA_OUT_P" at 1192.26,1628.71 h4.72 r90; Mechanical 1 "SC_DATA_OUT_N" at 1198.52,1628.67 h4.72 r90; Mechanical 1 "VDDPST" at 1205.21,1643.79 h4.72 r90; Mechanical 1 "GNDPST" at 1211.21,1643.79 h4.72 r90; Mechanical 1 "SC_CLOCK_OUT_P" at 1217.23,1623.76 h4.72 r90; Mechanical 1 "SC_CLOCK_OUT_N" at 1224.43,1623.79 h4.72 r90; Mechanical 1 "VDDA" at 1231.02,1670.76 h4.72 r90; Mechanical 1 "GNDA" at 1568.22,1669.8 h4.72 r90; Mechanical 1 "GNDA" at 1562.25,1669.76 h4.72 r90; Mechanical 1 "VDDGWT" at 1536.22,1660.8 h4.72 r90; Mechanical 1 "VDDA" at 1555.22,1669.8 h4.72 r90; Mechanical 1 "GNDGWT" at 1581.22,1660.8 h4.72 r90; Mechanical 1 "GNDA" at 1575.22,1669.8 h4.72 r90; Mechanical 1 "VDDA" at 1659.98,1669.8 h4.72 r90; Mechanical 1 "VDDA" at 1666.25,1669.76 h4.72 r90; Mechanical 1 "GNDA" at 1673.21,1654.79 h4.72 r90; Mechanical 1 "GNDA" at 1679.48,1654.75 h4.72 r90; Mechanical 1 "VDDA" at 1763.98,1670.8 h4.72 r90; Mechanical 1 "VDDA" at 1770.25,1670.76 h4.72 r90; Mechanical 1 "GNDA" at 1777.21,1654.79 h4.72 r90; Mechanical 1 "GNDA" at 1783.48,1654.75 h4.72 r90; Mechanical 1 "VDDA" at 1881.22,1670.8 h4.72 r90; Mechanical 1 "VDDA" at 1887.22,1670.8 h4.72 r90; Mechanical 1 "GNDA" at 1893.98,1670.8 h4.72 r90; Mechanical 1 "GNDA" at 1900.25,1670.76 h4.72 r90; Mechanical 1 "VDDA" at 1945.98,1670.8 h4.72 r90; Mechanical 1 "VDDA" at 1952.25,1670.76 h4.72 r90; Mechanical 1 "GNDA" at 1959.21,1654.79 h4.72 r90; Mechanical 1 "VDDGWT" at 1757.25,526.82 h4.72 r90; Mechanical 1 "GNDGWT" at 1738.21,537.79 h4.72 r90; Mechanical 1 "TEST_OUT_P" at 1829.44,526.7 h4.72 r90; Mechanical 1 "DIG_PIX_1" at 1822.29,526.9 h4.72 r90; Mechanical 1 "DIG_PIX_0" at 1815.72,526.79 h4.72 r90; Mechanical 1 "TEST_OUT_N" at 1835.72,526.79 h4.72 r90; Mechanical 1 "SERIAL_OUT_7_N" at 1750.66,526.87 h4.72 r90; Mechanical 1 "GNDGWT" at 1686.25,526.82 h4.72 r90; Mechanical 1 "VDDGWT" at 1705.25,526.82 h4.72 r90; Mechanical 1 "SERIAL_OUT_6_P" at 1692.66,526.87 h4.72 r90; Mechanical 1 "SERIAL_OUT_6_N" at 1698.66,526.87 h4.72 r90; Mechanical 1 "GNDGWT" at 1516.83,526.76 h4.72 r90; Mechanical 1 "SERIAL_OUT_3_P" at 1524.05,526.89 h4.72 r90; Mechanical 1 "SERIAL_OUT_3_N" at 1530.05,526.89 h4.72 r90; Mechanical 1 "GNDGWT" at 1464.29,526.79 h4.72 r90; Mechanical 1 "VDDGWT" at 1484.22,527.08 h4.72 r90; Mechanical 1 "SERIAL_OUT_2_P" at 1471.17,526.58 h4.72 r90; Mechanical 1 "SERIAL_OUT_7_P" at 1744.66,526.87 h4.72 r90; Mechanical 1 "GND2V5" at 1932.25,526.82 h4.72 r90; Mechanical 1 "GND" at 1406.31,526.75 h4.72 r90; Mechanical 1 "GND" at 1400.04,526.79 h4.72 r90; Mechanical 1 "VDD" at 1387.04,526.79 h4.72 r90; Mechanical 1 "VDD" at 1393.31,526.75 h4.72 r90; Mechanical 1 "GNDA" at 1965.27,526.79 h4.72 r90; Mechanical 1 "VDD2V5" at 1939.25,526.82 h4.72 r90; Mechanical 1 "TO_SYNC_P" at 1308.77,526.87 h4.72 r90; Mechanical 1 "TO_SYNC_N" at 1315.57,526.79 h4.72 r90; Mechanical 1 "RESET_P" at 1322.81,526.8 h4.72 r90; Mechanical 1 "RESET_N" at 1329.06,526.64 h4.72 r90; Mechanical 1 "GNDGWT" at 1412.59,526.73 h4.72 r90; Mechanical 1 "SERIAL_OUT_2_N" at 1477.43,526.79 h4.72 r90; Mechanical 1 "VDDGWT" at 1432.29,526.79 h4.72 r90; Mechanical 1 "SERIAL_OUT_1_P" at 1419.71,526.8 h4.72 r90; Mechanical 1 "SERIAL_OUT_1_N" at 1425.71,526.8 h4.72 r90; Mechanical 1 "GNDGWT" at 1634.25,526.82 h4.72 r90; Mechanical 1 "VDDGWT" at 1653.25,526.82 h4.72 r90; Mechanical 1 "SERIAL_OUT_5_P" at 1640.66,526.87 h4.72 r90; Mechanical 1 "SERIAL_OUT_5_N" at 1646.66,526.87 h4.72 r90; Mechanical 1 "VDDGWT" at 1601.25,526.82 h4.72 r90; Mechanical 1 "SERIAL_OUT_4_P" at 1588.6,526.87 h4.72 r90; Mechanical 1 "SERIAL_OUT_4_N" at 1594.6,526.87 h4.72 r90; Mechanical 1 "SERIAL_OUT_0_N" at 1373.74,526.8 h4.72 r90; Mechanical 1 "GND" at 1731.21,537.79 h4.72 r90; Mechanical 1 "VDD" at 1608.01,526.82 h4.72 r90; Mechanical 1 "VDD" at 1614.27,526.79 h4.72 r90; Mechanical 1 "GND" at 1621.01,526.82 h4.72 r90; Mechanical 1 "GND" at 1627.27,526.79 h4.72 r90; Mechanical 1 "VDD" at 1491.04,526.79 h4.72 r90; Mechanical 1 "VDD" at 1497.27,526.79 h4.72 r90; Mechanical 1 "GND" at 1504.01,526.82 h4.72 r90; Mechanical 1 "GND" at 1510.27,526.79 h4.72 r90; Mechanical 1 "VDD" at 1068.31,526.75 h4.72 r90; Mechanical 1 "VDD" at 1062.04,526.79 h4.72 r90; Mechanical 1 "GND" at 1055.31,526.75 h4.72 r90; Mechanical 1 "GND" at 1049.04,526.79 h4.72 r90; Mechanical 1 "GNDA" at 1042.31,526.75 h4.72 r90; Mechanical 1 "GNDA" at 1036.04,526.79 h4.72 r90; Mechanical 1 "VDDA" at 1029.31,526.75 h4.72 r90; Mechanical 1 "VDDA" at 1023.04,526.79 h4.72 r90; Mechanical 1 "SC_CLOCK_IN_P" at 1074.26,526.71 h4.72 r90; Mechanical 1 "SC_CLOCK_IN_N" at 1080.52,526.67 h4.72 r90; Mechanical 1 "SC_DATA_IN_P" at 1087.26,526.79 h4.72 r90; Mechanical 1 "SC_DATA_IN_N" at 1093.52,526.75 h4.72 r90; Mechanical 1 "VDDGWT" at 1380.52,526.8 h4.72 r90; Mechanical 1 "SERIAL_OUT_0_P" at 1367.74,526.8 h4.72 r90; Mechanical 1 "GNDGWT" at 1361.52,526.8 h4.72 r90; Mechanical 1 "CLK_REF_PLL_P" at 1853.77,526.87 h4.72 r90; Mechanical 1 "CLK_REF_PLL_N" at 1859.77,526.87 h4.72 r90; Mechanical 1 "DAC_OUT" at 1971.5,526.86 h4.72 r90; Mechanical 1 "VDD" at 1926.25,526.82 h4.72 r90; Mechanical 1 "VDD" at 1919.25,526.82 h4.72 r90; Mechanical 1 "GND" at 1906.25,526.82 h4.72 r90; Mechanical 1 "GND" at 1913.25,526.82 h4.72 r90; Mechanical 1 "VDDPST" at 1842.19,526.8 h4.72 r90; Mechanical 1 "GNDPST" at 1848.27,526.79 h4.72 r90; Mechanical 1 "GNDPLL" at 1867.21,538.79 h4.72 r90; Mechanical 1 "VDDPLL" at 1874.21,538.79 h4.72 r90; Mechanical 1 "VDD" at 1790.21,537.79 h4.72 r90; Mechanical 1 "VDD" at 1796.21,537.79 h4.72 r90; Mechanical 1 "GND" at 1802.21,537.79 h4.72 r90; Mechanical 1 "GND" at 1808.21,537.79 h4.72 r90; Mechanical 1 "VDD" at 1712.01,526.82 h4.72 r90; Mechanical 1 "VDD" at 1718.27,526.79 h4.72 r90; Mechanical 1 "GND" at 1724.21,537.79 h4.72 r90; Mechanical 1 "VDDA" at 1237.31,526.75 h4.72 r90; Mechanical 1 "GNDA" at 1244.04,526.79 h4.72 r90; Mechanical 1 "GNDA" at 1250.31,526.75 h4.72 r90; Mechanical 1 "GND" at 1257.04,526.79 h4.72 r90; Mechanical 1 "GND" at 1263.31,526.75 h4.72 r90; Mechanical 1 "VDD" at 1270.04,526.79 h4.72 r90; Mechanical 1 "VDD" at 1276.31,526.75 h4.72 r90; Mechanical 1 "SHUTTER_P" at 1282.26,526.71 h4.72 r90; Mechanical 1 "SHUTTER_N" at 1288.52,526.67 h4.72 r90; Mechanical 1 "VDDPST" at 1295.71,526.57 h4.72 r90; Mechanical 1 "GNDPST" at 1301.98,526.53 h4.72 r90; Mechanical 1 "VDDA" at 1335.04,526.79 h4.72 r90; Mechanical 1 "VDDA" at 1341.31,526.75 h4.72 r90; Mechanical 1 "GNDA" at 1348.04,526.79 h4.72 r90; Mechanical 1 "GNDA" at 1354.31,526.75 h4.72 r90; Mechanical 1 "VDDA" at 1439.04,526.79 h4.72 r90; Mechanical 1 "VDDA" at 1445.31,526.75 h4.72 r90; Mechanical 1 "GNDA" at 1452.04,526.79 h4.72 r90; Mechanical 1 "GNDA" at 1458.31,526.75 h4.72 r90; Mechanical 1 "VDDA" at 1543.01,526.82 h4.72 r90; Mechanical 1 "VDDA" at 1549.27,526.79 h4.72 r90; Mechanical 1 "VDDPST" at 1101.04,526.79 h4.72 r90; Mechanical 1 "GNDPST" at 1107.31,526.75 h4.72 r90; Mechanical 1 "SDA_I2C" at 1113.26,526.71 h4.72 r90; Mechanical 1 "SCL_I2C" at 1119.52,526.67 h4.72 r90; Mechanical 1 "ADD_I2C_0" at 1126.26,526.71 h4.72 r90; Mechanical 1 "ADD_I2C_1" at 1132.52,526.75 h4.72 r90; Mechanical 1 "VDDA" at 1140.04,526.79 h4.72 r90; Mechanical 1 "VDDA" at 1146.31,526.75 h4.72 r90; Mechanical 1 "GNDA" at 1153.04,526.79 h4.72 r90; Mechanical 1 "GNDA" at 1159.31,526.75 h4.72 r90; Mechanical 1 "GND" at 1166.04,526.79 h4.72 r90; Mechanical 1 "GND" at 1172.31,526.75 h4.72 r90; Mechanical 1 "VDD" at 1179.04,526.79 h4.72 r90; Mechanical 1 "VDD" at 1185.31,526.75 h4.72 r90; Mechanical 1 "SC_DATA_OUT_P" at 1191.26,526.71 h4.72 r90; Mechanical 1 "SC_DATA_OUT_N" at 1197.52,526.67 h4.72 r90; Mechanical 1 "VDDPST" at 1205.04,526.79 h4.72 r90; Mechanical 1 "GNDPST" at 1211.31,526.75 h4.72 r90; Mechanical 1 "SC_CLOCK_OUT_P" at 1217.26,526.79 h4.72 r90; Mechanical 1 "SC_CLOCK_OUT_N" at 1223.52,526.75 h4.72 r90; Mechanical 1 "VDDA" at 1231.04,526.79 h4.72 r90; Mechanical 1 "GNDA" at 1568.25,526.82 h4.72 r90; Mechanical 1 "GNDA" at 1562.27,526.79 h4.72 r90; Mechanical 1 "VDDGWT" at 1536.25,526.82 h4.72 r90; Mechanical 1 "VDDA" at 1555.25,526.82 h4.72 r90; Mechanical 1 "GNDGWT" at 1581.25,526.82 h4.72 r90; Mechanical 1 "GNDA" at 1575.25,526.82 h4.72 r90; Mechanical 1 "VDDA" at 1660.01,526.82 h4.72 r90; Mechanical 1 "VDDA" at 1666.27,526.79 h4.72 r90; Mechanical 1 "GNDA" at 1673.01,526.82 h4.72 r90; Mechanical 1 "GNDA" at 1679.27,526.79 h4.72 r90; Mechanical 1 "VDDA" at 1764.01,526.82 h4.72 r90; Mechanical 1 "VDDA" at 1770.27,526.79 h4.72 r90; Mechanical 1 "GNDA" at 1777.21,537.79 h4.72 r90; Mechanical 1 "GNDA" at 1783.21,537.79 h4.72 r90; Mechanical 1 "VDDA" at 1881.25,526.82 h4.72 r90; Mechanical 1 "VDDA" at 1887.25,526.82 h4.72 r90; Mechanical 1 "GNDA" at 1894.01,526.82 h4.72 r90; Mechanical 1 "GNDA" at 1900.27,526.79 h4.72 r90; Mechanical 1 "VDDA" at 1946.01,526.82 h4.72 r90; Mechanical 1 "VDDA" at 1952.27,526.79 h4.72 r90; Mechanical 1 "GNDA" at 1959.01,526.82 h4.72 r90; Mechanical 1 "30" at 930,482 h8; Mechanical 1 "39" at 930,472 h8; Mechanical 1 "44" at 931,462 h8; Mechanical 1 "69" at 930,442 h8; Mechanical 1 "30" at 2051,482 h8; Mechanical 1 "39" at 2052,472 h8; Mechanical 1 "44" at 2051.44,462.11 h8; Mechanical 1 "69" at 2051,442 h8; Mechanical 1 "30" at 930,1718 h8; Mechanical 1 "39" at 930,1730 h8; Mechanical 1 "44" at 930,1740 h8; Mechanical 1 "69" at 930,1760 h8; Mechanical 6 "Vias / 10mil hole / 20mil annular ring" at 1938.29,385 h4.72; Mechanical 6 "0201 / bypass cap / bottom side" at 1990.67,478.03 h4.72; Mechanical 6 "entire / top side / pad under / the chip / is GND" at 1985.53,562.16 h4.72; Mechanical 6 "bonding sites / 6mil x 8mil / 5mil min gap" at 1782.22,411 h4.72; Mechanical 6 "13mil / chip edge  / to GND / terminal of / 0201 cap" at 1985.72,503.8 h4.72; Mechanical 6 "0402 / bypass cap / bottom side" at 1968,288 h4.72
U5: Mechanical 7 "Default Padstyle: RX28Y10D0T" at 4480,1204.5 h50 r180; Mechanical 7 "Heat Tab Padstyle: RX75Y69D0T" at 4492.5,1264.5 h50 r180; Mechanical 7 "Alt 1 Padstyle: OX60Y90D30P" at 4467.5,1384.5 h50 r180; Mechanical 7 "Alt 2 Padstyle: OX90Y60D30P" at 4467.5,1444.5 h50 r180; Mechanical 7 "0.118in/2.997mm" at 4223.75,495.47 h25 r180; Mechanical 7 "0.016in/0.406mm" at 4274.75,645.47 h25 r180; Mechanical 7 "0.02in/0.5mm" at 4457,787.81 h25 r180; Mechanical 7 "0.079in/2.007mm" at 3953,807.5 h25 r180; Mechanical 7 "0.118in/2.997mm" at 4223.75,979.5 h25 r180
U6: Mechanical 7 "0.118in/2.997mm" at 4223.75,1474.5 h25 r180; Mechanical 7 "0.079in/2.007mm" at 3953,1302.5 h25 r180; Mechanical 7 "0.02in/0.5mm" at 4457,1282.81 h25 r180; Mechanical 7 "0.016in/0.406mm" at 4274.75,1140.47 h25 r180; Mechanical 7 "0.118in/2.997mm" at 4223.75,990.47 h25 r180; Mechanical 7 "Alt 2 Padstyle: OX90Y60D30P" at 4467.5,1939.5 h50 r180; Mechanical 7 "Alt 1 Padstyle: OX60Y90D30P" at 4467.5,1879.5 h50 r180; Mechanical 7 "Heat Tab Padstyle: RX75Y69D0T" at 4492.5,1759.5 h50 r180; Mechanical 7 "Default Padstyle: RX28Y10D0T" at 4480,1699.5 h50 r180
U7: Mechanical 7 "0.0511811in/1.3mm" at 566.54,1688.75 h25 r270; Mechanical 7 "6.692914E-02in/1.7mm" at 732.5,1940.59 h25 r270; Mechanical 7 "1.968504E-02in/0.5mm" at 755,1730 h25 r270; Mechanical 7 "1.574803E-02in/0.4mm" at 884.68,1644.41 h25 r270; Mechanical 7 "6.692914E-02in/1.7mm" at 1034.68,1670 h25 r270; Mechanical 7 "Alt 2 Padstyle: OX90Y60D30P" at 161.54,1457.5 h50 r270; Mechanical 7 "Alt 1 Padstyle: OX60Y90D30P" at 221.54,1457.5 h50 r270; Mechanical 7 "Default Padstyle: RX25p75Y11p84D0T" at 341.54,1370 h50 r270
U8: Mechanical 7 "0.0511811in/1.3mm" at 2364.75,658.78 h25 r180; Mechanical 7 "6.692914E-02in/1.7mm" at 2616.59,492.81 h25 r180; Mechanical 7 "1.968504E-02in/0.5mm" at 2406,470.31 h25 r180; Mechanical 7 "1.574803E-02in/0.4mm" at 2320.41,340.63 h25 r180; Mechanical 7 "6.692914E-02in/1.7mm" at 2346,190.63 h25 r180; Mechanical 7 "Alt 2 Padstyle: OX90Y60D30P" at 2133.5,1063.78 h50 r180; Mechanical 7 "Alt 1 Padstyle: OX60Y90D30P" at 2133.5,1003.78 h50 r180; Mechanical 7 "Default Padstyle: RX25p75Y11p84D0T" at 2046,883.78 h50 r180
U9: Mechanical 7 "0.0511811in/1.3mm" at 3658.75,293.46 h25 r180; Mechanical 7 "6.692914E-02in/1.7mm" at 3910.59,127.5 h25 r180; Mechanical 7 "1.968504E-02in/0.5mm" at 3700,105 h25 r180; Mechanical 7 "1.574803E-02in/0.4mm" at 3614.41,-24.68 h25 r180; Mechanical 7 "6.692914E-02in/1.7mm" at 3640,-174.68 h25 r180; Mechanical 7 "Alt 2 Padstyle: OX90Y60D30P" at 3427.5,698.46 h50 r180; Mechanical 7 "Alt 1 Padstyle: OX60Y90D30P" at 3427.5,638.46 h50 r180; Mechanical 7 "Default Padstyle: RX25p75Y11p84D0T" at 3340,518.46 h50 r180
U10: Mechanical 7 "Default Padstyle: RX25p75Y11p84D0T" at 3340,2183.46 h50 r180; Mechanical 7 "Alt 1 Padstyle: OX60Y90D30P" at 3427.5,2303.46 h50 r180; Mechanical 7 "Alt 2 Padstyle: OX90Y60D30P" at 3427.5,2363.46 h50 r180; Mechanical 7 "6.692914E-02in/1.7mm" at 3640,1490.31 h25 r180; Mechanical 7 "1.574803E-02in/0.4mm" at 3614.41,1640.31 h25 r180; Mechanical 7 "1.968504E-02in/0.5mm" at 3700,1770 h25 r180; Mechanical 7 "6.692914E-02in/1.7mm" at 3910.59,1792.5 h25 r180; Mechanical 7 "0.0511811in/1.3mm" at 3658.75,1958.46 h25 r180
U14: Bottom Overlay "*" at 668.25,313.39 h50